# Altium PCB Layout.PcbDoc
Units mm, origin at the board's own origin, x right, y up, seen from the top; angles counter-clockwise.
Board outline 70.8 x 79.88 mm, 2 copper layers (Top Layer, Bottom Layer); 42 components, 37 nets, 189 pads, 28 vias.
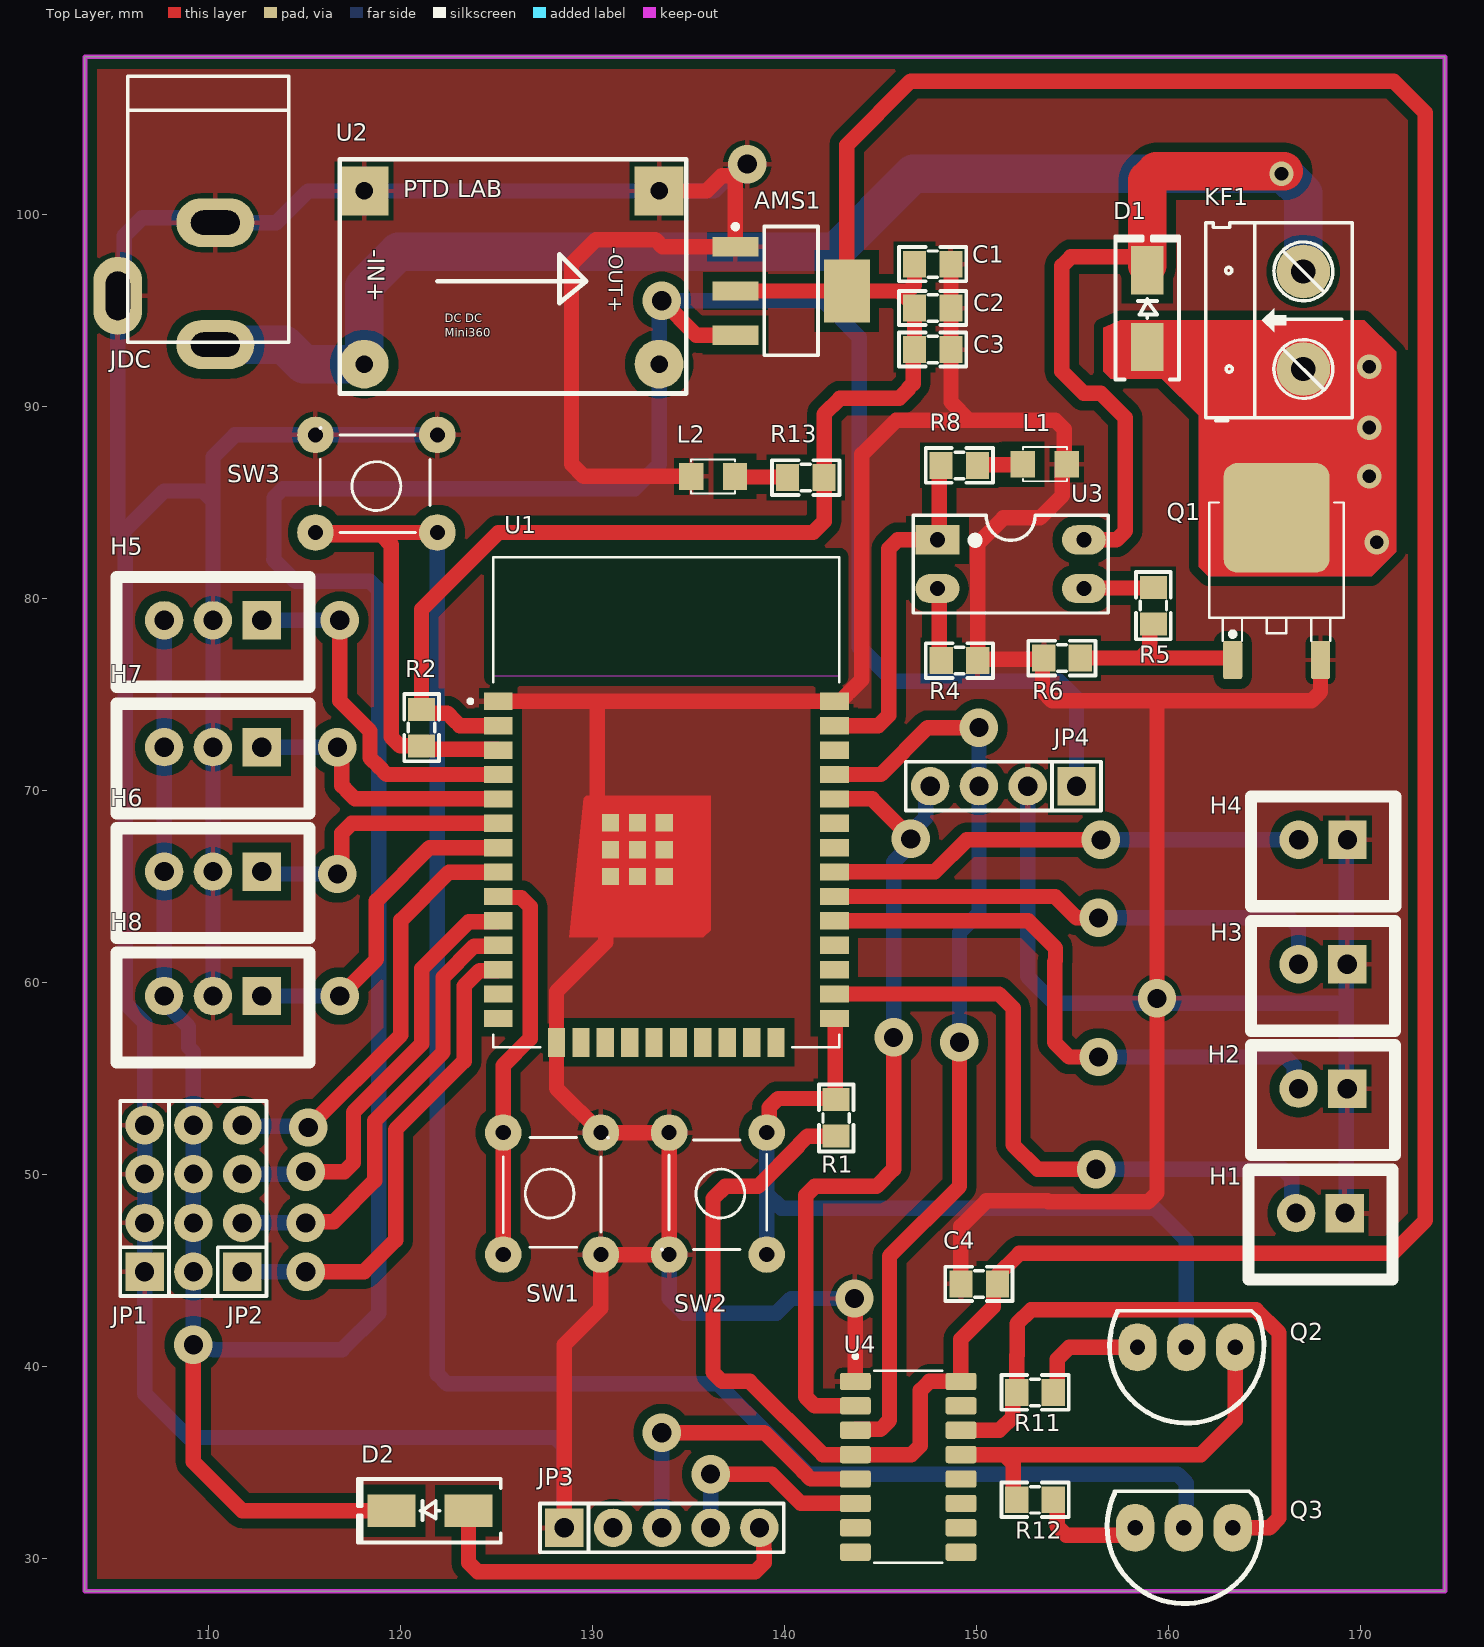
[diagram p0: Top Layer view]
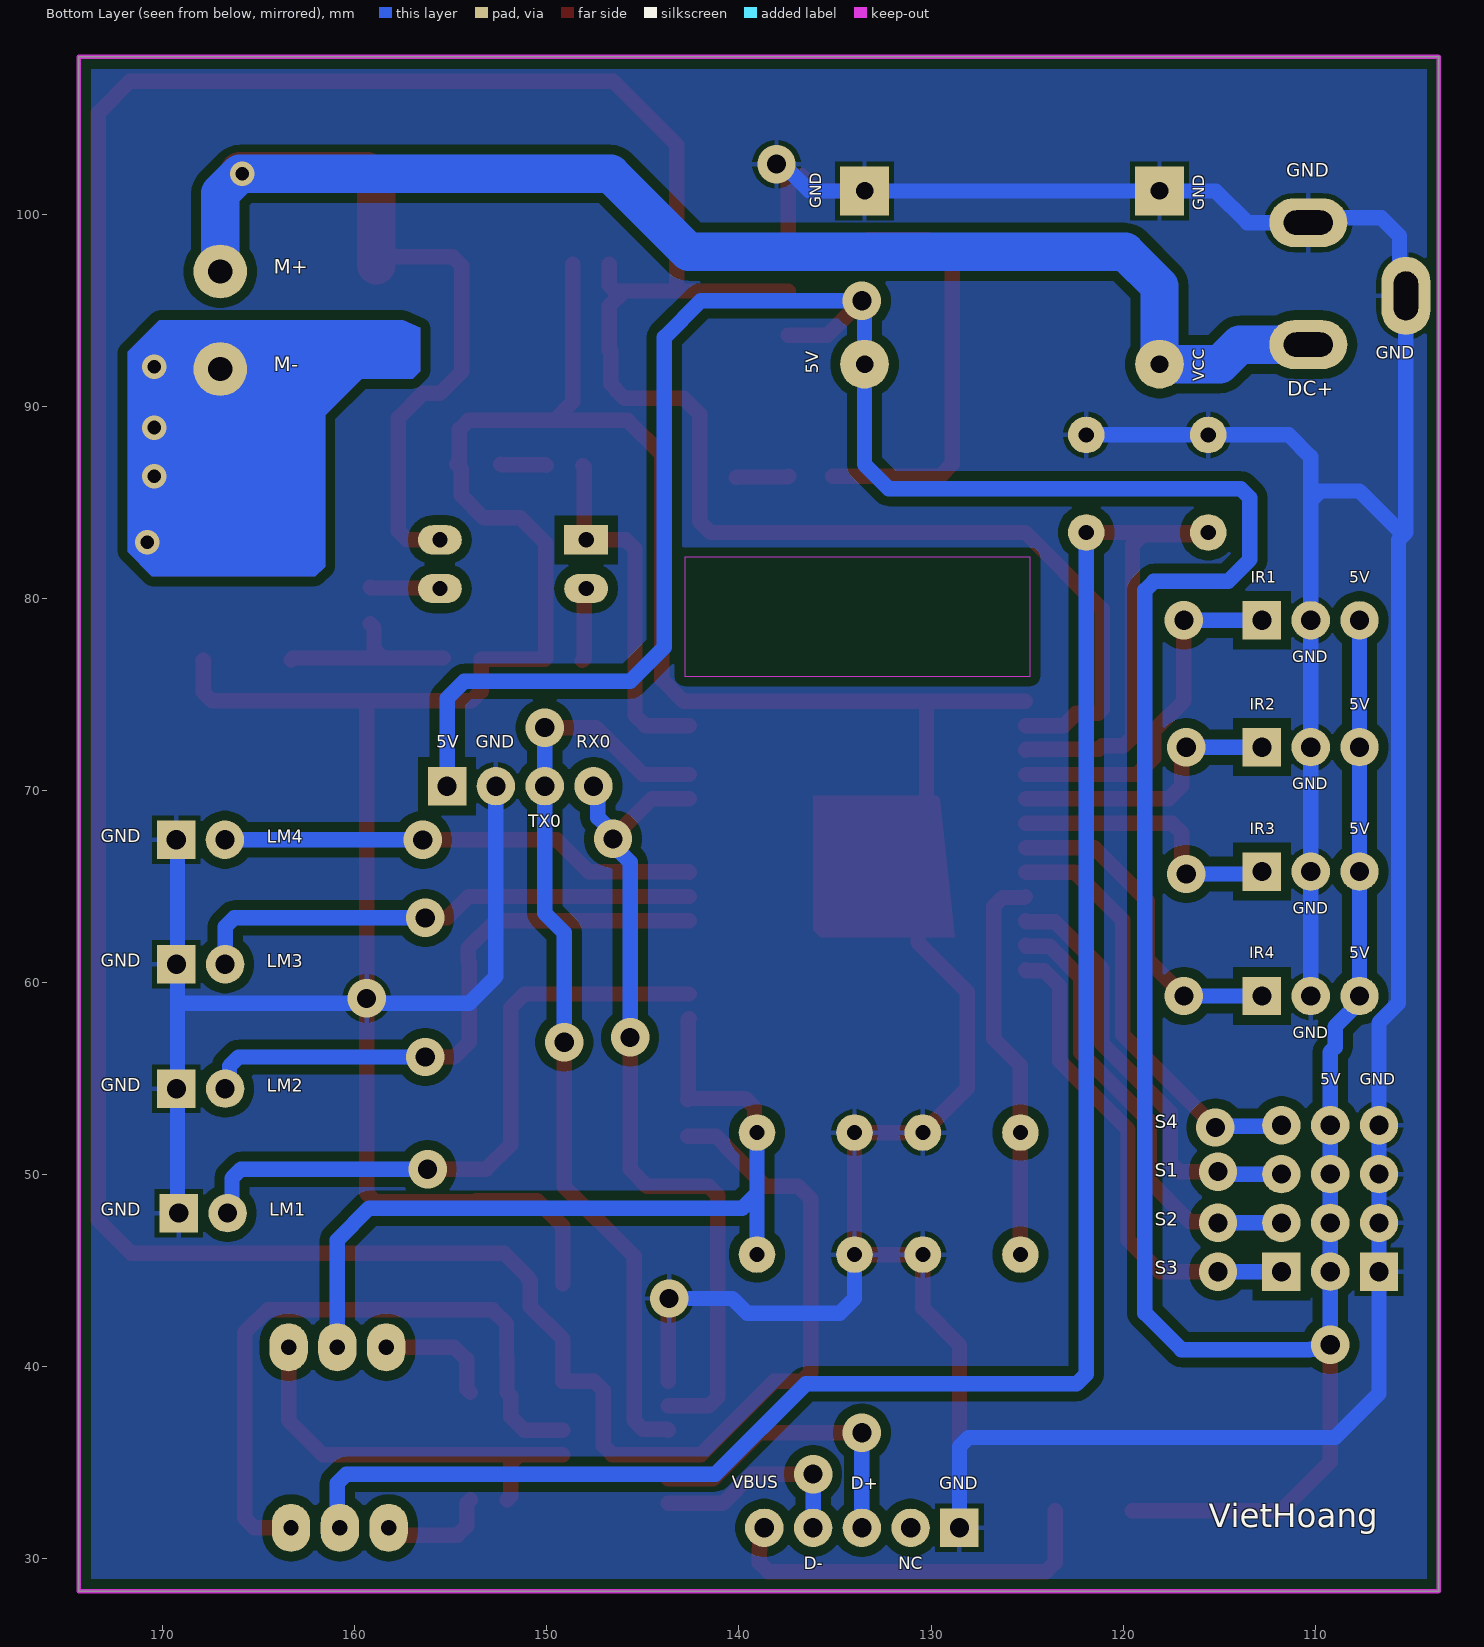
[diagram p1: Bottom Layer view, seen from below]
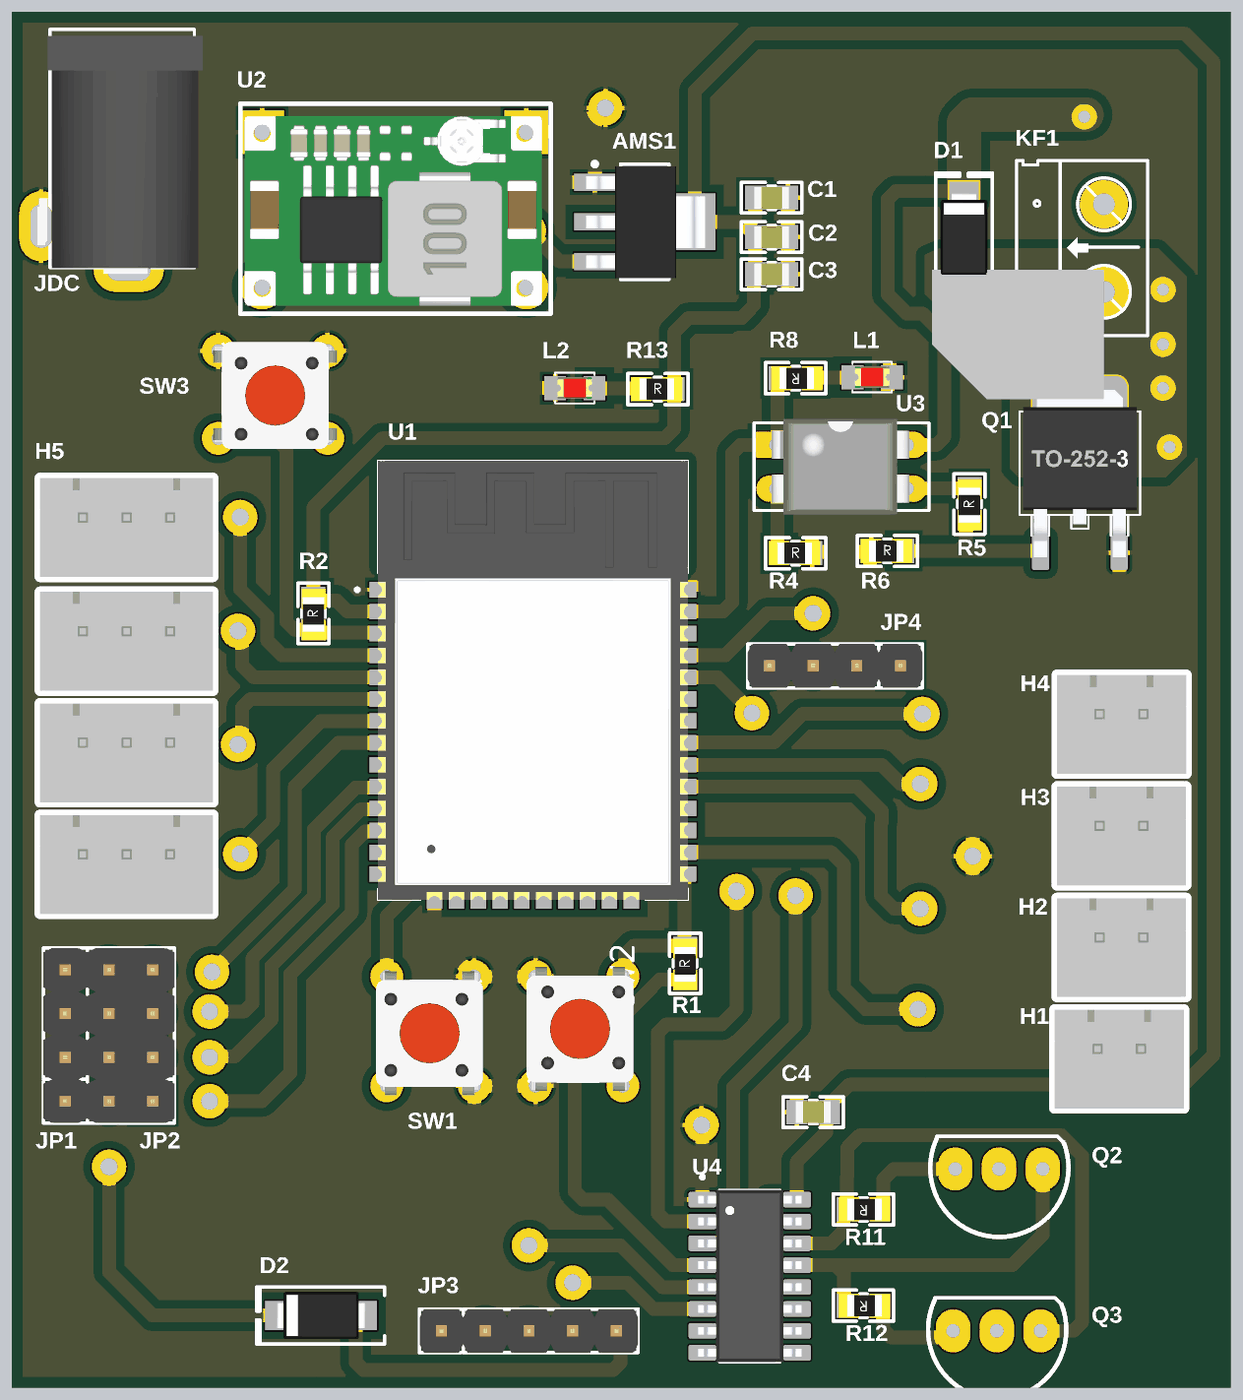
[diagram p2: 3D render of the assembled board from above, using the file's embedded part models]

## Layer stack, top to bottom
Top Solder: solder mask 0.0102, Solder Resist, Dk 3.5
Top Layer: signal copper 0.0356
Dielectric 1: dielectric 0.32, FR-4, Dk 4.8
Bottom Layer: signal copper 0.0356
Bottom Solder: solder mask 0.0102, Solder Resist, Dk 3.5

## Board outline
103.569,28.321 103.568,108.204 174.371,108.204 174.371,28.321

## Design rules (kind name [scope] priority, off if disabled: settings)
Clearance [All] p1: gap=0.5 ignorepadtopadclearanceinfootprint=FALSE
PolygonConnect [All] p1: connectstyle=Relief reliefconductorwidth=0.254 reliefentries=4 polygonreliefangle="90 Angle" airgapwidth=0.254
RoutingVias [All] p1: holewidth=1 width=2 viastyle="Through Hole" minholewidth=1 minwidth=2 maxholewidth=1 maxwidth=2
SolderMaskExpansion [All] p1: expansion=0.102 istentingtop=FALSE
Width [All] p1: maxlimit=0.8 minlimit=0.8 preferedwidth=0.8
30 further rules are at their usual default settings.

## Components (designator, comment, footprint, x,y, rotation, side; value= is the part's Value field where it differs from the comment)
AMS1 "AMS1117" SOT223-4N 140.335,96.012 r0 top
C1 "104" "tu 0805" 147.701,97.409 r0 top
C2 "104" "tu 0805" 147.701,95.123 r0 top
C3 "104" "tu 0805" 147.701,92.964 r0 top
C4 "104" "tu 0805" 150.114,44.323 r0 top
D1 "SS14" "DIODE SMA" 158.877,95.091 r90 top
D2 "SS14" "DIODE SMA" 121.539,32.512 r180 top
H1 "Header 2P 2.54 Duc Thang" XH2.54M-2 169.164,48.006 r180 top
H2 "Header 2P 2.54 Duc Thang" XH2.54M-2 169.291,54.483 r180 top
H3 "Header 2P 2.54 Duc Thang" XH2.54M-2 169.291,60.96 r180 top
H4 "Header 2P 2.54 Duc Thang" XH2.54M-2 169.302,67.44 r180 top
H5 "Header 3P 2.54 Duc Thang" XH2.54M-3 112.776,78.867 r180 top
H6 "Header 3P 2.54 Duc Thang" XH2.54M-3 112.776,65.786 r180 top
H7 "Header 3P 2.54 Duc Thang" XH2.54M-3 112.776,72.263 r180 top
H8 "Header 3P 2.54 Duc Thang" XH2.54M-3 112.776,59.309 r180 top
JDC "Jac DC" DC0 107.823,96.393 r270 top
JP1 "JP 1x4 2.54" "JP 1x4 DT" 106.68,44.958 r90 top
JP2 "JP 2x4 2.54" "JP 2x4 DT" 110.49,48.768 r90 top
JP3 "JP 1x5 2.54" "JP 1x5 DT" 128.524,31.623 r0 top
JP4 "JP 1x4 2.54" "JP 1x4 DT" 155.194,70.231 r180 top
KF1 "CON 2 KF301" "Con 2 KF301 5.08" 167.005,91.948 r90 top
L1 "LED 0805" LED-0805-Red 152.4,86.995 r0 top
L2 "LED 0805" LED-0805-Red 137.414,86.36 r180 top
Q1 "IRF3205" TO252-123 165.608,80.501 r0 top
Q2 "C1815" TO92 160.909,41.021 r90 top value=C9014
Q3 "C1815" TO92 160.782,31.623 r90 top value=C9014
R1 "10k" "tro smd 0805" 142.621,52.959 r90 top
R2 "10k" "tro smd 0805" 121.031,73.279 r90 top
R4 "1k" "tro smd 0805" 149.098,76.835 r0 top
R5 "1k" "tro smd 0805" 159.131,79.629 r90 top
R6 "10k" "tro smd 0805" 154.432,76.962 r0 top
R8 "1k" "tro smd 0805" 149.098,86.868 r180 top
R11 "10k" "tro smd 0805" 153.035,38.608 r180 top
R12 "10k" "tro smd 0805" 153.035,33.02 r180 top
R13 "1k" "tro smd 0805" 141.097,86.36 r0 top
SW1 "SW" SW2-DIP 125.349,45.847 r90 top value="Button chip 4 pin"
SW2 "SW" SW2-DIP 139.065,52.197 r270 top value="Button chip 4 pin"
SW3 "SW" SW2-DIP 121.92,83.439 r180 top value="Button chip 4 pin"
U1 "ESP32-WROOM-32E_(4MB_HIGH_TEMP)" XCVR_ESP32-WROOM-32E_(4MB_HIGH_TEMP) 133.837,69.389 r0 top
U2 "DC DC Mini 360" DC_DC_MINI360 125.73,96.647 r0 top
U3 "PC817" DIP4/W0.3 147.955,83.058 r270 top
U4 "CH340C" SOIC127P600X180-16N 146.431,34.798 r0 top

## Footprints (in the part's own frame and the unit in brackets; to place one, negate y for a bottom-side part, rotate by r counter-clockwise, add the part's x,y. Pads: shape width x height; smd on the part's side, far side on the other; paste and mask are expansions set on the pad)
"Con 2 KF301 5.08" [mil]
  round 110 hole 50: 1(0,0) 2(200,0)
  silkscreen extent -106,-100 300,200, body extent -97,-148 297,148, height 394
DC0 [mil] "Jac DC input"
  oval 100x160 hole 50 slot 100 at 90 deg: 1(125,100) 2(-125,100)
  oval 160x100 hole 50 slot 100 at 0 deg: 3(25,-100)
  silkscreen extent -425,-80 120,250, body extent -410,-105 134,269, height 434
DC_DC_MINI360 [mil]
  round 100 hole 36 paste-99999 mask+2: 1(304.5,-175)
  rect 100x100 hole 36 paste-99999 mask+4: 2(304.49,180) 4(-300,180)
  round 100 hole 36 paste-99999 mask+4: 3(-300,-175)
  silkscreen extent -350,-235 360,245, body extent -340,-217 340,217, height 165
"DIODE SMA" [mm] "SMA"
  rect 2.5x1.7 smd: 1(-2,0) 2(2,0)
  silkscreen extent -3.68,-1.65 3.75,1.65, body extent -2.6,-1.37 2.6,1.37, height 2.4
DIP4/W0.3 [mil] "4 PIN, W 300mil, Pin to pin 100mil"
  rect 60x90 hole 31: 1(0,0)
  oval 60x90 hole 31: 2(100,0) 3(100,300) 4(0,300)
  silkscreen extent -50,-50 150,350, body extent -59,-10 159,305, height 170
"JP 1x4 DT" [mm] "4 pins, 1 row, straight, gold plating"
  rect 2x2 hole 1: 1(0,0)
  round 2 hole 1: 2(2.54,0) 3(5.08,0) 4(7.62,0)
  silkscreen extent -1.27,-1.27 8.89,1.27, body extent -1.27,-1.27 8.89,1.27, height 8.54
"JP 1x5 DT" [mm] "5 pins, 1 row, straight, gold plating"
  rect 2x2 hole 1: 1(0,0)
  round 2 hole 1: 2(2.54,0) 3(5.08,0) 4(7.62,0) 5(10.16,0)
  silkscreen extent -1.27,-1.27 11.43,1.27, body extent -1.27,-1.27 11.43,1.27, height 8.54
"JP 2x4 DT" [mm]
  rect 2x2 hole 1: 1(-3.81,-1.27)
  round 2 hole 1: 2(-1.27,-1.27) 3(1.27,-1.27) 4(3.81,-1.27) 5(3.81,1.27) 6(1.27,1.27) 7(-1.27,1.27) 8(-3.81,1.27)
  silkscreen extent -5.08,-2.54 5.08,2.54, body extent -5.08,-2.54 5.08,2.54, height 8.55
LED-0805-Red [mil]
  rect 50x55 smd: 1(0,0) 2(90,0)
  silkscreen extent 0,-35 90,35, body extent 5,-25 85,25, height 43
SOIC127P600X180-16N [mm]
  rrect25% 1.6x0.9 smd: 1(-2.75,4.445) 2(-2.75,3.175) 3(-2.75,1.905) 4(-2.75,0.635) 5(-2.75,-0.635) 6(-2.75,-1.905) 7(-2.75,-3.175) 8(-2.75,-4.445) 9(2.75,-4.445) 10(2.75,-3.175) 11(2.75,-1.905) 12(2.75,-0.635) 13(2.75,0.635) 14(2.75,1.905) 15(2.75,3.175) 16(2.75,4.445)
  silkscreen extent -2.85,-5 1.78,5.85, body extent -3,-5 3,5, height 1.8
SOT223-4N [mm] "SOT223, 4-Leads, Body 6.5x3.5mm, Pitch 2.3mm, Lead Span 7mm, IPC Medium Density"
  rect 2.4x1 smd: 1(-2.9,2.3) 2(-2.9,0) 3(-2.9,-2.3)
  rect 2.4x3.3 smd: 4(2.9,0)
  silkscreen extent -3.02,-3.35 1.4,3.47, body extent -3.39,-3.27 3.5,3.23, height 1.72
SW2-DIP [mil] "SW button 4pin, 250 x250 mil"
  round 75 hole 31: 1(0,0) 2(0,-200) 3(250,-200) 4(250,0)
  silkscreen extent 15,-215 240,0, body extent -22,-220 262,24, height 276
TO92 [mm] "TO, Flat Index; 3 In-Line, Axial Leads; Body Dia. 4.8mm"
  oval 2.5x2 hole 0.8: 1(0,-2.54) 2(0,0) 3(0,2.54)
  silkscreen extent -3.95,-4.04 1.91,3.99
TO252-123 [mm]
  round 0.5 on Mech15: 0(0,0)
  rrect25% 1x2 smd: 1(-2.285,-3.7) 3(2.285,-3.7)
  rrect25% 5.5x5.7 smd: 2(0,3.7)
  silkscreen extent -3.5,-2.7 3.5,4.5, body extent -3.3,-3.95 3.3,5.76, height 2.31
"tro smd 0805" [mm]
  rect 1.2x1.4 smd: 1(-0.946,-0.061) 2(0.954,-0.061)
  silkscreen extent -1.75,-0.97 1.75,0.84, body extent -1.56,-0.76 1.44,0.64, height 0.53
"tu 0805" [mm] "Compoment SMD 80x50mil"
  rect 1.2x1.4 smd: 1(-0.946,-0.003) 2(0.954,-0.003)
  silkscreen extent -1.75,-0.89 1.75,0.89, body extent -1.01,-0.64 1.01,0.63, height 0.61
XCVR_ESP32-WROOM-32E_(4MB_HIGH_TEMP) [mm]
  rect 1.5x0.9 smd: 1(-8.75,5.26) 2(-8.75,3.99) 3(-8.75,2.72) 4(-8.75,1.45) 5(-8.75,0.18) 6(-8.75,-1.09) 7(-8.75,-2.36) 8(-8.75,-3.63) 9(-8.75,-4.9) 10(-8.75,-6.17) 11(-8.75,-7.44) 12(-8.75,-8.71) 13(-8.75,-9.98) 14(-8.75,-11.25) 25(8.75,-11.25) 26(8.75,-9.98) 27(8.75,-8.71) 28(8.75,-7.44) 29(8.75,-6.17) 30(8.75,-4.9) 31(8.75,-3.63) 32(8.75,-2.36) 33(8.75,-1.09) 34(8.75,0.18) 35(8.75,1.45) 36(8.75,2.72) 37(8.75,3.99) 38(8.75,5.26)
  rect 0.9x1.5 smd: 15(-5.715,-12.5) 16(-4.445,-12.5) 17(-3.175,-12.5) 18(-1.905,-12.5) 19(-0.635,-12.5) 20(0.635,-12.5) 21(1.905,-12.5) 22(3.175,-12.5) 23(4.445,-12.5) 24(5.715,-12.5)
  rect 0.9x0.9 smd: 39_1(-2.9,-1.06) 39_2(-1.5,-1.06) 39_3(-0.1,-1.06) 39_4(-2.9,-2.46) 39_5(-1.5,-2.46) 39_6(-0.1,-2.46) 39_7(-2.9,-3.86) 39_8(-1.5,-3.86) 39_9(-0.1,-3.86)
  round 0 all layers, no hole mask+0: 39_10(-2.2,-1.06) 39_11(-0.8,-1.06) 39_12(-2.9,-1.76) 39_13(-1.5,-1.76) 39_14(-0.1,-1.76) 39_15(-2.2,-2.46) 39_16(-0.8,-2.46) 39_17(-2.9,-3.16) 39_18(-1.5,-3.16) 39_19(-0.1,-3.16) 39_20(-2.2,-3.86) 39_21(-0.8,-3.86)
  Keep-Out Layer region: 9,6.56 -9,6.56 -9,12.75 9,12.75
  silkscreen extent -10.3,-12.75 9,12.75, body extent -9,-12.75 9,12.75, height 3.25
XH2.54M-2 [mm]
  rect 2x2 hole 1: 1(0,0)
  round 2 hole 1: 2(2.54,0)
  silkscreen extent -2.48,-2.26 5.02,3.46, body extent -2.48,-2.26 5.02,3.48, height 6.91
XH2.54M-3 [mm]
  rect 2x2 hole 1: 1(0,0)
  round 2 hole 1: 2(2.54,0) 3(5.08,0)
  silkscreen extent -2.48,-2.26 7.56,3.46, body extent -2.48,-2.26 7.56,3.48, height 6.91

## Part data
AMS1: "AMS"
C1 C2 C3 C4: library part "Tu 0805 104 50V 10%", "Dán", Chung_Loai=Dán, Don_Vi=Con, Ma_Hang=MH004551, So_Chan=2, Ten_Linh_Kien="Tụ 0805 104-100nF 10% 50V"
D1 D2: library part "Diode SS14 ( 1N5819)", "Dán", Chung_Loai=Dán, Don_Vi=Con, Ma_Hang=MH002211, Ten_Linh_Kien="Diode SS14 DO214 Schottky 1A 40V ( 1N5819 DO214)"
H1 H2 H3 H4 H5 H6 H7 H8 KF1: "Cắm", Chung_Loai=Cắm, Don_Vi=Con
  H1 H2 H3 H4: Ma_Hang=MH001283, Ten_Linh_Kien="Header 2P XH2.54-2P Đực Thẳng"
  H5 H6 H7 H8: Ma_Hang=MH001292, Ten_Linh_Kien="Header 3P XH2.54-3P Đực Thẳng"
  KF1: Ma_Hang=MH000987, Ten_Linh_Kien="CON 2 KF301-2P 5.08MM Xanh Dương"
JDC: library part DCIN, "Jac DC input"
JP1 JP4: library part "JP 1x4 2.54 Duc Thang", "Cắm", Chung_Loai=Cắm, Don_Vi=Con, Ma_Hang=MH000903, Ten_Linh_Kien="Jump Đơn Đực 2.54MM 1x40P Thẳng 11MM"
JP2: library part "JP 2x4 2.54 Duc Thang", "Cắm", Chung_Loai=Cắm, Don_Vi=Con, Ma_Hang=MH002686, Ten_Linh_Kien="Jump Đôi Đực 2.54MM 2x40P Thẳng 11MM"
JP3: library part "JP 1x5 2.54 Duc Thang", "Cắm", Chung_Loai=Cắm, Don_Vi=Con, Ma_Hang=MH000903, Ten_Linh_Kien="Jump Đơn Đực 2.54MM 1x40P Thẳng 11MM"
L1 L2: library part "LED 0805 Do", "Dán", Chung_Loai=Dán, Don_Vi=Con, Ma_Hang=MH000897, Ten_Linh_Kien="LED 0805 Màu Đỏ (Red)"
Q2 Q3: "NPN transistor"
R1 R2 R6 R11 R12: library part "Tro 0805 5% 10k", "Dán", Chung_Loai=Dán, Don_Vi=Con, Ma_Hang=MH005239, So_Chan=2, Ten_Linh_Kien="Trở 0805 5% 10k"
R4 R5 R8 R13: library part "Tro 0805 1% 5.1k", "Dán", Chung_Loai=Dán, Don_Vi=Con, Ma_Hang=MH008812, So_Chan=2, Ten_Linh_Kien="Trở 0805 1% 5.1k"
SW1 SW2 SW3: library part SW4, "Switch button 4 pin"
U1: "Bluetooth, WiFi 802.11b/g/n, Bluetooth v4.2 +EDR, Class 1, 2 and 3 Transceiver Module 2.4GHz ~ 2.5GHz Integrated, Trace Surface Mount", Package="SMD-44 Espressif Systems", Availability="In Stock", Check_prices=https://www.snapeda.com/parts/ESP32-WROOM-32E%20(4MB%20HIGH%20TEMP)/Espressif+Systems/view-part/?ref=eda, MF="Espressif Systems", MP="ESP32-WROOM-32E (4MB HIGH TEMP)", Price=None, Purchase-URL="https://pricing.snapeda.com/search/part/ESP32-WROOM-32E (4MB HIGH TEMP)/?ref=eda", SnapEDA_Link=https://www.snapeda.com/parts/ESP32-WROOM-32E%20(4MB%20HIGH%20TEMP)/Espressif+Systems/view-part/?ref=snap
U3: "Single Opto"
U4: "USB to serial chip CH340", Package=None, Availability="Not in stock", Check_prices=https://www.snapeda.com/parts/CH340C/WCH/view-part/?ref=eda, MF=WCH, MP=CH340C, Price=None, SnapEDA_Link=https://www.snapeda.com/parts/CH340C/WCH/view-part/?ref=snap

## Via types
v1: diameter 2, hole 1, Top Layer to Bottom Layer, 23 vias
v2: diameter 1.27, hole 0.711, Top Layer to Bottom Layer, 5 vias

## Nets (pads, with @x,y where several pads share a name; then routed paths per layer and width w, separated by ;. In a path a pad name is that pad's centre, name@x,y a point inside that pad or via, vN(x,y) a via of type N, cw(c..) or ccw(c..) an arc to the next point about the centre after c; other vN are vias at no path point)
3V3: AMS1.2 AMS1.4 C1.1 C2.1 C3.1 C4.2 R1.1 R2.2 R13.2 U1.2 U4.4 U4.16 | length 220.9
  Top Layer w0.8: U1.2 123.09,73.379 122.809,73.66 122.436,74.033 121.292,74.033 R2.2 121.092,79.436 125.095,83.439 141.478,83.439 142.051,84.012 R13.2 142.051,89.6 142.875,90.424 145.962,90.424 146.431,90.893 146.431,90.932 146.685,91.186 146.685,92.89 C3.1 C2.1 146.755,95.22 145.963,96.012 ; AMS1.2 AMS1.4 ; R1.1 141.186,52.013 140.718,51.545 140.718,51.513 138.608,49.403 136.906,49.403 136.271,48.768 136.271,39.712 136.74,39.243 138.176,39.243 141.986,35.433 U4.4 146.597,35.433 147.066,35.902 147.066,38.774 147.535,39.243 U4.16 149.17,39.254 149.17,41.441 150.868,43.139 150.868,44.485 C4.2@151.003,44.62 ; C1.1 146.755,96.313 146.455,96.012 145.963,96.012 ; C4.2@151.003,44.704 152.212,45.913 171.635,45.913 173.355,47.633 173.355,105.283 171.704,106.934 146.558,106.934 143.235,103.611 AMS1.4 ; AMS1.4 145.963,96.012
+5: AMS1.3 D2.2 H5.3 H6.3 H7.3 H8.3 JP2.5 JP2.6 JP2.7 JP2.8 JP4.1 U2.1 | length 191.9
  Top Layer w0.8: v1(109.22,41.148) 109.22,35.052 111.76,32.512 D2.2 ; U2.1 U2.1@133.797,92.535 ; v1(133.604,95.504) 135.396,93.712 AMS1.3
  Bottom Layer w0.8: H5.3 H7.3 H6.3 H8.3 107.696,58.984 108.966,57.714 108.966,56.642 109.22,56.388 JP2.5 JP2.6 JP2.7 JP2.8 v1(109.22,41.148) 109.45,40.918 110.264,40.918 110.289,40.894 116.967,40.894 118.872,42.799 118.872,80.43 118.403,80.899 114.531,80.899 113.399,82.03 113.411,82.042 113.411,85.256 113.88,85.725 132.207,85.725 133.464,86.982 U2.1 133.464,95.364 v1(133.604,95.504) 141.986,95.504 143.891,93.599 143.891,77.47 145.669,75.692 154.305,75.692 155.194,74.803 JP4.1
BOOT: Q2.2 R1.2 SW2.1 SW2.4 U1.25 | length 44.1
  Top Layer w0.8: SW2.1 139.192,52.324 139.192,53.506 139.661,53.975 142.62,53.975 R1.2@142.634,53.961 ; U1.25 142.634,58.092 R1.2@142.634,53.961 ; R1.2 R1.2@142.634,53.961
  Bottom Layer w0.8: SW2.4 139.065,49.022 ; SW2.1 139.065,49.022 ; Q2.2 160.909,46.609 159.258,48.26 139.827,48.26 139.065,49.022
BUTTON: SW1.1 SW1.4 U1.9 | length 20.6
  Top Layer w0.8: U1.9 125.137,64.439 126.277,64.439 126.746,63.97 126.746,57.085 125.349,55.688 SW1.4 SW1.1
D+: JP3.3 U4.5 | length 16
  Top Layer w0.8: v1(133.604,36.576) 138.938,36.576 140.97,34.544 141.351,34.163 U4.5
  Bottom Layer w0.8: JP3.3 v1(133.604,36.576)
D-: JP3.4 U4.6 | length 11
  Top Layer w0.8: v1(136.144,34.417) 139.319,34.417 140.843,32.893 U4.6
  Bottom Layer w0.8: JP3.4 v1(136.144,34.417)
DTR: Q2.1 R12.2 U4.13 | length 21.4
  Top Layer w0.8: U4.13 151.423,35.433 ; R12.2 151.892,33.269 151.892,34.964 151.423,35.433 ; Q2.1 163.449,37.211 161.671,35.433 151.423,35.433
GND: AMS1.1 C1.2 C2.2 C3.2 C4.1 H1.1 H2.1 H3.1 H4.1 H5.2 H6.2 H7.2 H8.2 JDC.2 JDC.3 JP1.1 JP1.2 JP1.3 JP1.4 JP3.1 JP4.2 L1.2 L2.2 Q1.3 R4.2 R6.1 SW1.2 SW1.3 SW2.2 SW2.3 SW3.2 SW3.3 U1.1 U1.15 U1.38 U1.39_1 U1.39_2 U1.39_3 U1.39_4 U1.39_5 U1.39_6 U1.39_7 U1.39_8 U1.39_9 U2.2 U2.4 U4.1 | length 446.8
  Top Layer w0.8: U1.1 130.302,74.649 ; JP3.1 128.524,41.148 130.429,43.053 SW1.2 SW2.3 SW2.2 SW1.3 128.122,54.504 U1.15 128.122,59.542 130.683,62.103 130.683,64.389 ; 131.445,65.278 130.898,65.278 130.237,65.939 130.237,74.584 130.302,74.649 ; U2.2 135.934,101.219 136.717,102.002 v1@137.435,102.002 ; L2.2 129.54,86.36 128.905,86.995 128.905,97.409 130.175,98.679 133.271,98.679 133.638,98.312 AMS1.1 v1@137.435,102.002 ; v1(138.049,102.616) v1@137.435,102.002 ; v1(143.637,43.561) 143.681,43.517 U4.1 ; C1.2 C2.2 C3.2 148.655,90.232 149.606,89.281 ; C4.1 149.168,47.314 150.495,48.641 153.68,48.641 153.729,48.592 158.916,48.592 159.385,49.061 v1(159.385,59.182) 159.385,74.676 ; Q1.3 167.893,75.145 167.424,74.676 159.385,74.676 ; 130.302,74.649 U1.38 142.887,74.649 144.018,75.78 144.018,87.503 145.796,89.281 149.606,89.281 ; 149.606,89.281 154.09,89.281 154.559,88.812 154.559,87.122 L1.2 154.451,86.76 154.451,85.363 153.289,84.201 151.384,84.201 150.052,82.869 150.052,76.901 150.116,76.838 153.423,76.838 153.423,75.177 153.924,74.676 159.385,74.676
  Bottom Layer w0.8: 105.664,83.566 107.696,85.598 109.728,85.598 110.109,85.217 110.236,85.217 ; H8.2 H6.2 H7.2 H5.2 110.236,85.217 ; SW3.2 SW3.3 111.379,88.519 110.236,87.376 110.236,85.217 ; JP3.1 128.524,35.853 128.055,36.322 108.966,36.322 106.68,38.608 JP1.1 JP1.2 JP1.3 JP1.4 106.68,57.921 105.664,58.937 105.664,83.058 105.283,83.439 JDC.3 105.616,96.091 105.616,98.885 106.553,99.822 110.109,99.822 JDC.2 113.538,99.568 115.189,101.219 U2.4 136.335,101.219 137.732,102.616 v1(138.049,102.616) ; SW2.3 133.985,43.561 134.747,42.799 139.573,42.799 140.335,43.561 v1(143.637,43.561) ; JP4.2 152.654,60.325 154.051,58.928 169.233,58.928 ; H1.1 169.233,48.075 169.233,58.928 ; H4.1 169.233,67.372 169.233,58.928
"IR 1": H5.1 U1.4 | length 18.9
  Top Layer w0.8: v1(116.84,78.867) 116.84,74.676 118.413,73.103 118.413,71.706 118.872,71.247 119.28,70.839 U1.4
  Bottom Layer w0.8: H5.1 v1(116.84,78.867)
"IR 2": H7.1 U1.5 | length 14.5
  Top Layer w0.8: v1(116.713,72.263) 116.943,72.033 116.943,70.255 117.348,69.85 117.629,69.569 U1.5
  Bottom Layer w0.8: H7.1 v1(116.713,72.263)
"IR 3": H6.1 U1.6 | length 14.6
  Top Layer w0.8: v1(116.713,65.659) 116.943,65.889 116.943,67.794 117.448,68.299 U1.6
  Bottom Layer w0.8: H6.1 112.903,65.659 v1(116.713,65.659)
"IR 4": H8.1 U1.7 | length 17.3
  Top Layer w0.8: v1(116.84,59.309) 118.745,61.214 118.745,64.262 121.512,67.029 U1.7
  Bottom Layer w0.8: H8.1 v1(116.84,59.309)
"LIMIT 1": H1.2 U1.26 | length 33.9
  Top Layer w0.8: U1.26 151.157,59.409 151.892,58.674 151.892,51.562 153.162,50.292 v1(156.21,50.292)
  Bottom Layer w0.8: v1(156.21,50.292) 165.926,50.292 166.394,49.823 166.394,48.236 H1.2
"LIMIT 2": H2.2 U1.29 | length 31.3
  Top Layer w0.8: U1.29 152.681,63.219 154.101,61.799 154.101,61.137 154.051,61.087 154.051,56.896 154.813,56.134 v1(156.337,56.134)
  Bottom Layer w0.8: v1(156.337,56.134) 166.053,56.134 166.521,55.665 166.521,54.713 H2.2
"LIMIT 3": H3.2 U1.30 | length 26.8
  Top Layer w0.8: U1.30 154.078,64.489 155.194,63.373 v1(156.337,63.373)
  Bottom Layer w0.8: v1(156.337,63.373) 166.282,63.373 166.751,62.904 H3.2
"LIMIT 4": H4.2 U1.31 | length 24.9
  Top Layer w0.8: U1.31 142.614,65.786 147.828,65.786 149.479,67.437 v1(156.464,67.437)
  Bottom Layer w0.8: v1(156.464,67.437) 156.466,67.439 166.76,67.439 H4.2
MOSFET: R8.2 U1.37 U3.1 | length 18.4
  Top Layer w0.8: U1.37 144.88,73.379 145.415,73.914 145.415,82.589 145.884,83.058 U3.1 148.049,83.152 148.049,86.834 R8.2
NetD1_1: D1.1 KF1.1 Q1.2 | length 13.8
  Top Layer w0.8: Q1.2 165.608,88.177 166.331,88.9 v2(170.434,88.9) 170.344,88.99 170.027,88.99 167.069,91.948 KF1.1
  other v2: 170.815,82.931 170.434,86.36 170.434,92.075
NetD2_1: D2.1 JP3.5 | length 20.4
  Top Layer w0.8: D2.1 123.539,29.806 124.008,29.337 138.469,29.337 138.938,29.806 138.938,30.468 138.914,30.493 138.914,31.393 JP3.5
NetL1_1: L1.1 R8.1 | length 2.4
  Top Layer w0.8: R8.1 150.077,86.962 152.367,86.962 L1.1
NetL2_1: L2.1 R13.1 | length 2.8
  Top Layer w0.8: L2.1 137.444,86.33 140.121,86.33 R13.1
NetQ1_1: Q1.1 R5.1 R6.2 | length 10
  Top Layer w0.8: R6.2 158.535,76.901 ; R5.1 159.004,78.496 159.004,77.37 158.535,76.901 ; Q1.1 163.223,76.901 158.535,76.901
NetQ2_3: Q2.3 R11.1 | length 6.3
  Top Layer w0.8: R11.1 154.181,38.869 154.181,40.389 154.813,41.021 Q2.3
NetQ3_3: Q3.3 R12.1 | length 5.9
  Top Layer w0.8: R12.1 154.181,32.881 154.181,31.711 154.649,31.242 157.861,31.242 Q3.3
NetR4_1: R4.1 U3.2 | length 3.8
  Top Layer w0.8: U3.2 148.054,80.419 148.054,76.873 R4.1
NetR5_2: R5.2 U3.3 | length 3.6
  Top Layer w0.8: U3.3 155.608,80.551 159.159,80.551 R5.2
RST: Q3.2 R2.1 SW3.1 SW3.4 U1.3 | length 113.9
  Top Layer w0.8: SW3.1 SW3.4 115.697,83.312 118.999,83.312 119.513,82.798 119.513,72.802 119.982,72.333 R2.1 121.266,72.159 125.037,72.159 U1.3
  Bottom Layer w0.8: SW3.1 121.92,39.624 122.428,39.116 136.525,39.116 141.224,34.417 160.44,34.417 160.909,33.948 160.909,31.75 Q3.2
RTS: Q3.1 R11.2 U4.14 | length 34.6
  Top Layer w0.8: U4.14 151.181,36.703 151.881,37.403 151.881,38.469 R11.2 152.081,40.597 152.103,40.62 152.103,42.248 152.826,42.971 164.547,42.971 165.735,41.783 165.735,32.131 165.227,31.623 Q3.1
RX_0: JP4.4 U1.34 U4.2 | length 44
  Top Layer w0.8: U1.34 144.553,69.569 146.558,67.564 v1(146.558,67.486) ; U4.2 141.566,37.973 141.097,38.442 141.097,48.934 141.566,49.403 144.78,49.403 145.669,50.292 v1(145.669,57.15)
  Bottom Layer w0.8: v1(145.669,57.15) 145.669,66.272 146.558,67.161 v1(146.558,67.486) 146.558,67.811 147.344,68.597 147.344,70.001 JP4.4
SCL: U1.36
SDA: U1.33
"SERVO 1": JP2.3 U1.10 | length 22.6
  Top Layer w0.8: v1(115.062,50.165) 117.083,50.165 117.552,50.634 117.552,53.26 121.115,56.823 121.115,60.738 123.546,63.169 125.037,63.169 U1.10
  Bottom Layer w0.8: JP2.3 114.935,50.038 v1(115.062,50.165)
"SERVO 2": JP2.2 U1.11 | length 23.4
  Top Layer w0.8: v1(115.062,47.498) 115.119,47.555 116.516,47.555 118.652,49.691 118.652,52.804 122.215,56.368 122.215,60.283 123.831,61.899 125.037,61.899 U1.11
  Bottom Layer w0.8: JP2.2 v1(115.062,47.498)
"SERVO 3": JP2.1 U1.12 | length 25.5
  Top Layer w0.8: v1(115.062,44.958) 118.11,44.958 119.752,46.6 119.752,52.349 123.315,55.912 123.315,59.827 124.117,60.629 125.037,60.629 U1.12
  Bottom Layer w0.8: JP2.1 v1(115.062,44.958)
"SERVO 4": JP2.4 U1.8 | length 22.4
  Top Layer w0.8: v1(115.197,52.461) 120.015,57.279 120.015,63.246 122.528,65.759 U1.8
  Bottom Layer w0.8: JP2.4 111.818,52.52 115.139,52.52 v1(115.197,52.461)
TX_0: JP4.3 U1.35 U4.3 | length 48.5
  Top Layer w0.8: U1.35 145.007,70.839 147.447,73.279 v1(150.114,73.279) ; U4.3 143.731,36.753 144.989,36.753 145.458,37.222 145.458,45.763 149.098,49.403 v1(149.098,56.896)
  Bottom Layer w0.8: v1(149.098,56.896) 149.098,62.611 150.114,63.627 JP4.3 v1(150.114,73.279)
VCC: D1.2 JDC.1 KF1.2 U2.3 U3.4 | length 102.9
  Top Layer w0.8: U3.4 157.265,83.058 157.734,83.527 157.734,89.408 156.464,90.678 155.575,90.678 154.432,91.821 154.432,97.321 154.901,97.79 158.427,97.79 158.877,97.34 D1.2
  Top Layer w2: D1.2@158.877,97.34 158.877,101.766 159.346,102.235 v2@165.989,102.235
  Bottom Layer w2: JDC.1 113.943,93.218 114.959,92.202 U2.3 118.11,96.266 119.888,98.044 142.621,98.044 146.685,102.108 165.989,102.108 167.005,101.092 KF1.2
  other v2: 165.862,102.108
pads on no net: JP3.2 Q1.0 U1.13 U1.14 U1.16 U1.17 U1.18 U1.19 U1.20 U1.21 U1.22 U1.23 U1.24 U1.27 U1.28 U1.32 U1.39_10 U1.39_11 U1.39_12 U1.39_13 U1.39_14 U1.39_15 U1.39_16 U1.39_17 U1.39_18 U1.39_19 U1.39_20 U1.39_21 U4.7 U4.8 U4.9 U4.10 U4.11 U4.12 U4.15

## Polygon pours and split planes (outlines as drawn)
GND on Top Layer "GND_L01_P001" (solid, remove dead copper, pour order 1): 103.505,108.204 103.505,28.321 174.371,28.321 174.371,108.204
GND on Bottom Layer "GND_L02_P000" (solid, remove dead copper, pour order 0): 103.505,108.204 103.505,28.321 174.371,28.321 174.371,108.204

## Keep-outs
Keep-Out Layer:
  the board outline again, w0.254

## Other copper
Top Layer:
  region net GND: 129.54,69.596 129.667,69.723 136.144,69.723 136.144,62.738 135.763,62.357 128.778,62.357
  region net NetD1_1: 157.48,94.488 170.18,94.488 171.831,92.837 171.831,82.423 170.561,81.153 162.052,81.153 161.544,81.661 161.544,89.535 159.639,91.44 156.972,91.44 156.591,91.821 156.591,94.107
Bottom Layer:
  region net NetD1_1: 157.48,94.488 170.18,94.488 171.831,92.837 171.831,82.423 170.561,81.153 162.052,81.153 161.544,81.661 161.544,89.535 159.639,91.44 156.972,91.44 156.591,91.821 156.591,94.107

## Silkscreen, mask and mechanical layers (free items; w line width, h text height)
Bottom Overlay:
  text "GND" at 111.501,101.716 h1.2
  text "GND" at 135.52,100.33 h1 r270
  text "GND" at 115.581,100.203 h1 r270
  text "M+" at 164.211,96.647 h1.3
  text "GND" at 106.843,92.249 h1.1
  text "5V" at 135.648,91.694 h1.1 r270
  text "M-" at 164.211,91.567 h1.3
  text "VCC" at 115.581,91.313 h1 r270
  text "DC+" at 111.471,90.284 h1.3
  text "5V" at 108.223,80.611 h1
  text "IR1" at 113.367,80.616 h1
  text "GND" at 111.187,76.466 h1
  text "5V" at 108.222,74.008 h1
  text "IR2" at 113.417,74.012 h1
  text "RX0" at 148.469,72.003 h1.1
  text "GND" at 153.697,71.999 h1.1
  text "5V" at 155.773,72.004 h1.1
  text "GND" at 111.187,69.862 h1
  text "TX0" at 150.98,67.853 h1.1
  text "5V" at 108.222,67.531 h1
  text "IR3" at 113.42,67.53 h1
  text "GND" at 173.24,67.073 h1.15
  text "LM4" at 164.592,67.056 h1.15
  text "GND" at 111.184,63.386 h1
  text "5V" at 108.222,61.054 h1
  text "IR4" at 113.429,61.058 h1
  text "GND" at 173.24,60.593 h1.15
  text "LM3" at 164.592,60.579 h1.15
  text "GND" at 111.184,56.909 h1
  text "GND" at 107.696,54.483 h1
  text "5V" at 109.728,54.483 h1
  text "GND" at 173.24,54.116 h1.15
  text "LM2" at 164.592,54.102 h1.15
  text "S4" at 118.364,52.197 h1.2
  text "S1" at 118.364,49.657 h1.2
  text "GND" at 173.24,47.639 h1.15
  text "LM1" at 164.465,47.625 h1.15
  text "S2" at 118.364,47.117 h1.2
  text "S3" at 118.364,44.577 h1.2
  text "VBUS" at 140.381,33.449 h1.1
  text "GND" at 129.567,33.399 h1.1
  text "D+" at 134.189,33.398 h1.1
  text "VietHoang" at 115.552,31.242 h2.1
  text "NC" at 131.712,29.229 h1.1
  text "D-" at 136.623,29.228 h1.1

## Text inside footprints (layer, text, board x,y; h text height)
U1: Mechanical 13 "ANTEN" at 127.837,78.389 h1.78
U2: Top Overlay "DC DC  / Mini360" at 122.301,93.472 h0.76; Top Overlay "-IN+" at 117.983,98.171 h1.52 r270; Top Overlay "PTD LAB" at 120.142,100.584 h1.52; Top Overlay "-OUT+" at 130.571,98.298 h1.27 r270